# Altium PCB slave.PcbDoc (part 4 of 8)
Units mm, origin at the board's own origin, x right, y up, seen from the top; angles counter-clockwise.
Board outline 160 x 100 mm, 6 copper layers (Top, FUSED_VBAT-, Signals1, Signals2, SUPPLY, Bottom), stack 1.67 mm thick; 597 components, 381 nets, 1695 pads, 3029 vias.
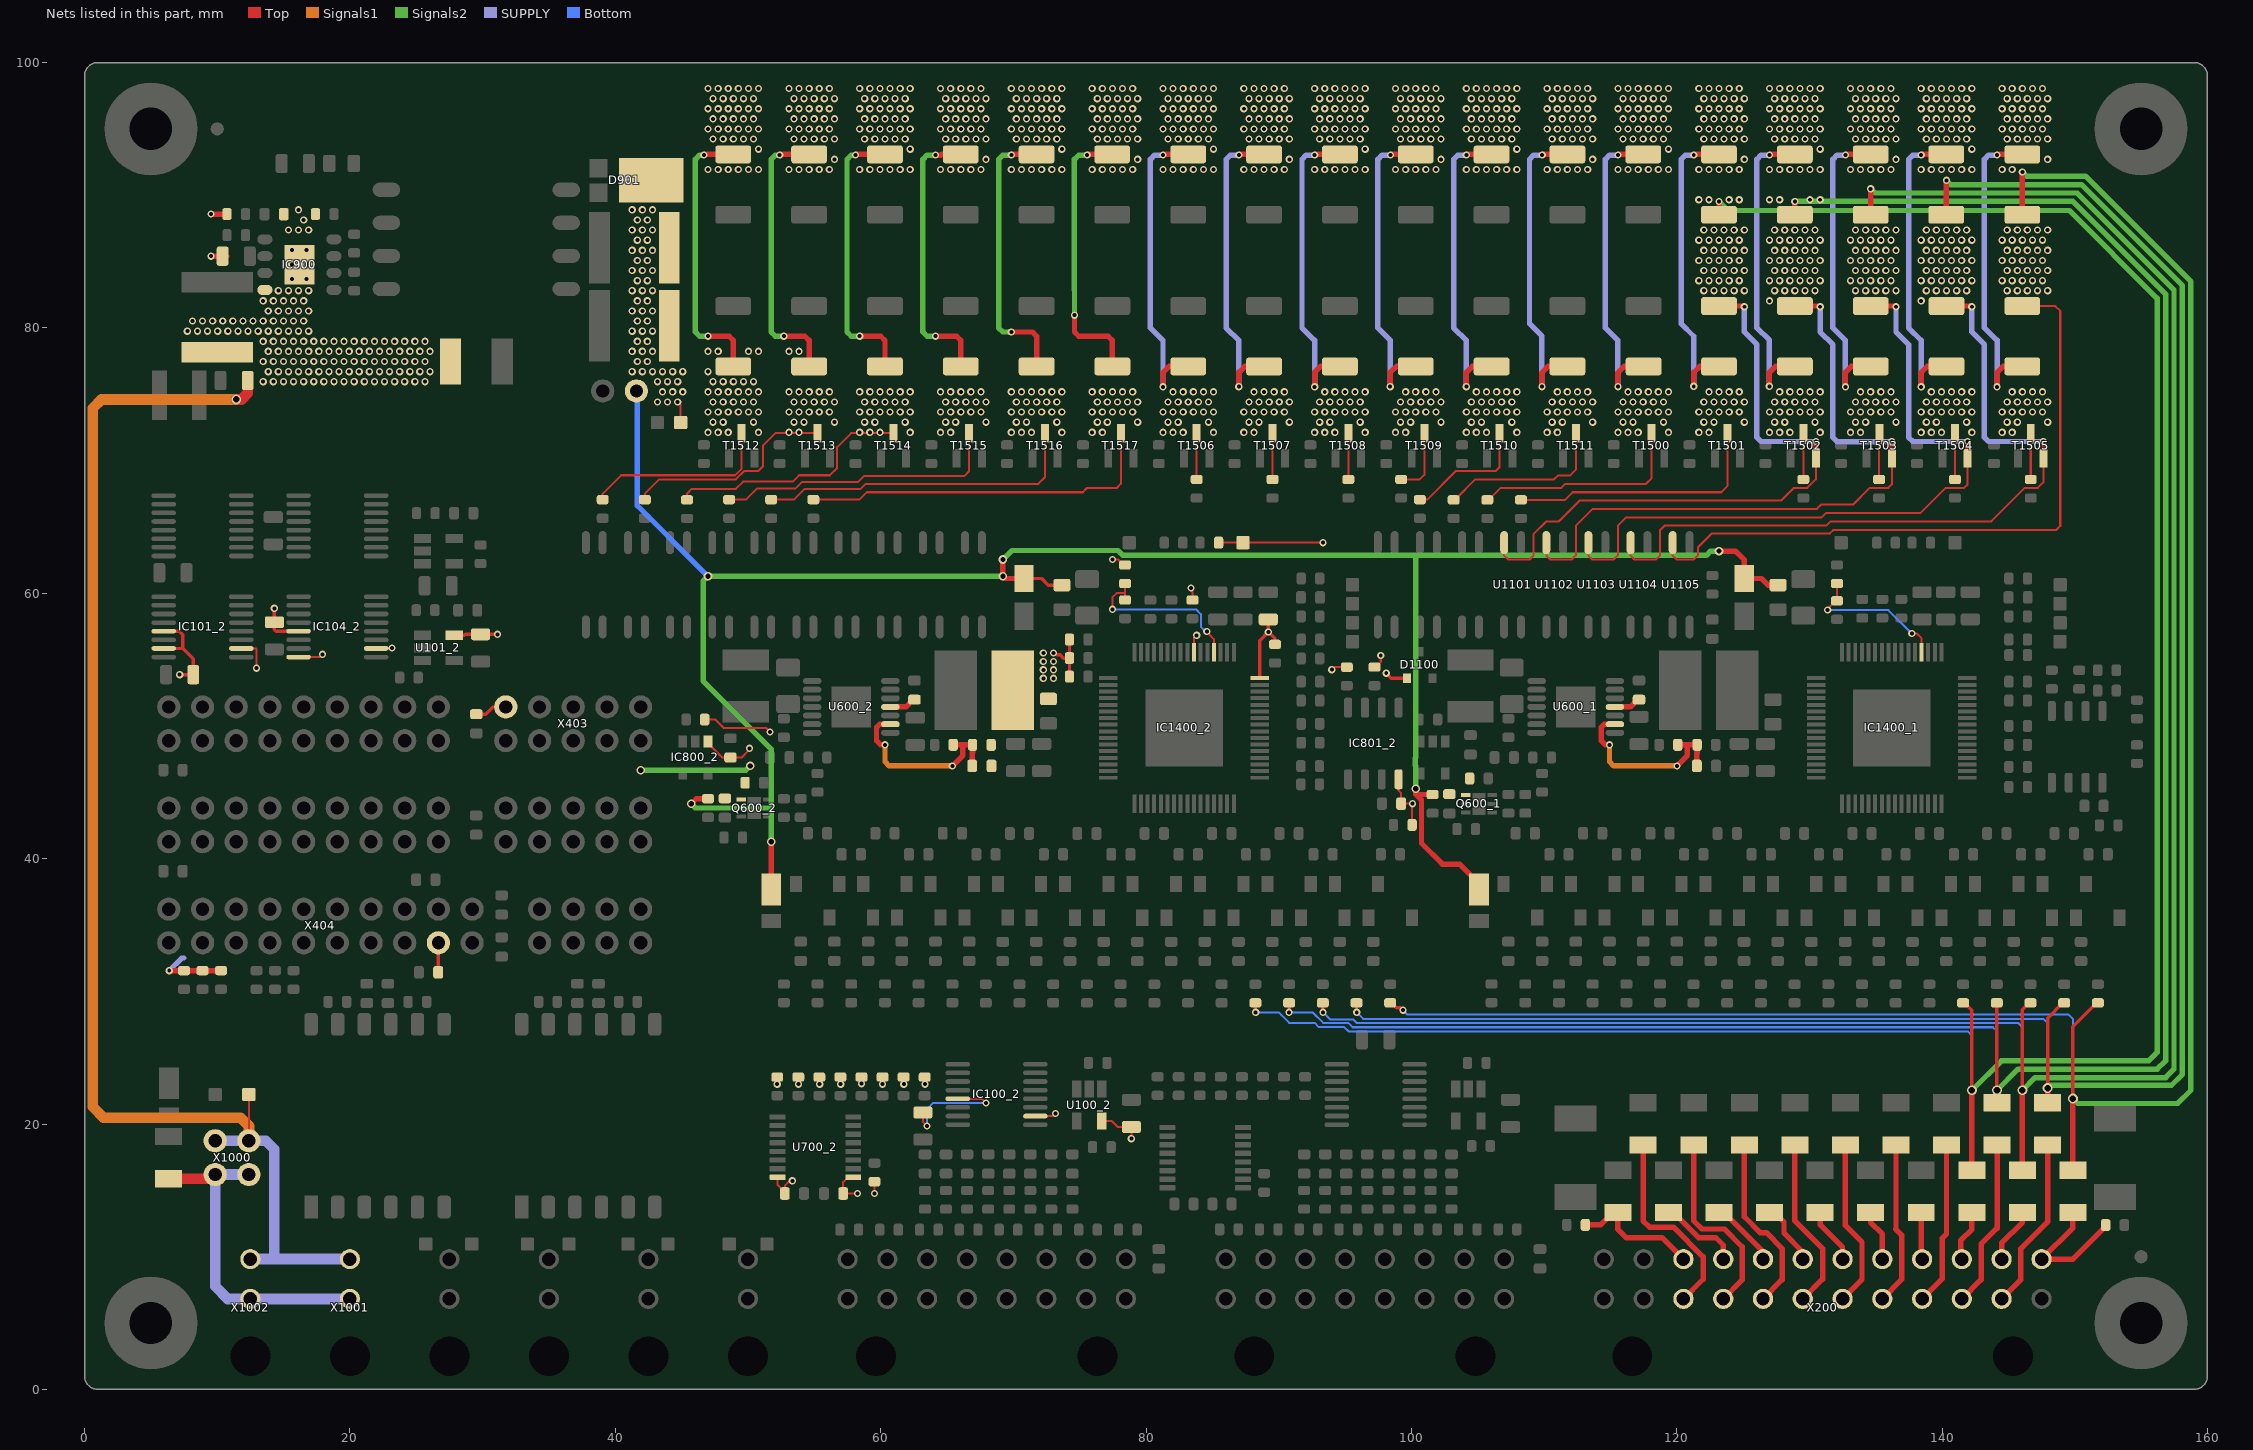
[diagram p7: the nets of this part, all layers, seen from the top]

## Via types
v1: diameter 0.55, hole 0.3, Top to Bottom, tented both sides, 2991 vias
v2: diameter 0.75, hole 0.5, Top to Bottom, tented both sides, 22 vias
v3: diameter 0.65, hole 0.4, Top to Bottom, tented both sides, 16 vias

## Nets (pads, with @x,y where several pads share a name; then routed paths per layer and width w, separated by ;. In a path a pad name is that pad's centre, name@x,y a point inside that pad or via, vN(x,y) a via of type N, cw(c..) or ccw(c..) an arc to the next point about the centre after c; other vN are vias at no path point) (continued)
+5.0V_VREG_1: C101_2.2 C102_2.2 C103_2.2 C104_2.2 C105_2.2 C403.2 C407.2 C604_2.2 C700_2.2 C701_2.2 C800_2.2 C801_2.2 C1401_2.2 D1100.1 IC100_2.2 IC100_2.13 IC101_2.2 IC101_2.13 IC101_2.15 IC104_2.2 IC104_2.13 IC104_2.16 IC800_2.1 IC801_2.8 IC1400_2.48 IC1400_2.55 L600_2.2 LD1400_2.2 R602_2.1 R604_2.1 R700_2.2 R701_2.2 R702_2.2 R703_2.2 R704_2.2 R705_2.2 R706_2.2 R707_2.2 R708_2.1 R800_2.2 R801_2.2 R1404_2.2 R1407_2.2 R1419_2.2 R1420_2.2 R1421_2.2 R1422_2.2 R1423_2.2 R1424_2.2 R1425_2.2 R1426_2.2 R1427_2.2 TP1403_2.1 U100_2.5 U101_2.5 U700_2.1 U700_2.16 X403.9 X404.4 | length 102.8
  Top w0.152: IC101_2.2@11.786,55.842 12.921,55.842 12.954,55.809 v1(12.954,54.356) ; IC104_2.16@16.125,55.193 17.728,55.193 v1(17.939,55.404) ; IC104_2.2@21.946,55.842 23.139,55.842 v1(23.177,55.88) ; R800_2.2@46.737,50.482 47.554,50.482 48.189,49.847 51.363,49.847 v1(51.663,49.548) ; IC800_2.1@46.988,48.825 46.988,48.7 48.063,47.625 C800_2.2@48.677,47.625 49.53,47.625 50.109,48.204 v1(50.109,48.316) ; v1(52.205,23.006) R707_2.2@52.205,23.535 R707_2.2@52.205,23.585 ; U700_2.16@52.236,15.981 52.236,15.401 C700_2.2@52.774,14.864 ; C700_2.2@52.774,14.764 C700_2.2@52.774,14.864 ; v1(53.34,15.716) 53.15,15.716 52.774,15.34 C700_2.2@52.774,14.864 ; R706_2.2@53.792,23.535 53.792,23.026 v1(53.813,23.006) ; R706_2.2@53.792,23.585 53.813,23.565 R706_2.2@53.813,23.535 ; R705_2.2@55.38,23.535 55.38,23.026 v1(55.4,23.006) ; R705_2.2@55.38,23.585 55.4,23.565 R705_2.2@55.4,23.535 ; R704_2.2@56.967,23.535 56.967,23.026 v1(56.988,23.006) ; R704_2.2@56.967,23.585 56.988,23.565 R704_2.2@56.988,23.535 ; U700_2.1@57.936,15.981 57.536,15.981 57.18,15.625 C701_2.2@57.18,14.764 v1(58.261,14.764) ; v1(58.555,23.044) R703_2.2@58.555,23.535 ; R703_2.2@58.555,23.585 R703_2.2@58.58,23.56 ; v1(59.531,14.764) R708_2.1@59.531,15.651 ; v1(60.142,23.006) R702_2.2@60.142,23.535 R702_2.2@60.142,23.585 ; R701_2.2@61.73,23.535 61.73,23.026 v1(61.75,23.006) ; R701_2.2@61.73,23.585 61.75,23.565 R701_2.2@61.75,23.535 ; C101_2.2@63.182,20.869 63.182,20.161 v1(63.5,19.844) ; R700_2.2@63.317,23.535 63.317,23.026 v1(63.338,23.006) ; R700_2.2@63.317,23.585 63.338,23.565 R700_2.2@63.338,23.535 ; IC100_2.13@65.814,21.9 67.635,21.9 v1(67.945,21.59) ; IC100_2.2@71.664,20.6 72.988,20.6 v1(73.184,20.796) 73.184,20.637 v1@73.146,20.6 ; U100_2.5@76.674,20.231 77.4,20.231 77.86,19.771 C103_2.2@78.899,19.771 v1(78.899,18.891) ; v1(77.47,62.547) 77.911,62.547 78.323,62.136 R1407_2.2@78.422,62.136 ; v1(83.384,60.397) 83.502,60.279 R1404_2.2@83.502,59.488 ; IC1400_2.55@83.618,55.598 83.618,56.63 v1(83.82,56.832) ; LD1400_2.2@85.523,63.817 TP1403_2.1@87.312,63.817 v1(93.345,63.817) ; v1(94.005,54.245) 94.194,54.434 R1419_2.2@95.135,54.434 ; R1420_2.2@97.223,54.437 97.323,54.437 97.693,54.808 v1(97.693,55.309) ; IC801_2.8@99.04,45.98 99.04,45.128 99.235,44.933 C801_2.2@99.235,44.147 v1(100.081,44.147) 100.057,44.124 R801_2.2@100.057,42.545
  Top w0.254: IC101_2.15@5.965,55.843 7.403,55.843 ; IC101_2.13@5.965,57.143 7.119,57.143 7.396,56.866 7.396,55.85 7.403,55.843 ; v1(7.166,53.868) C102_2.2@8.191,53.868 8.191,55.055 7.403,55.843 ; v1(14.306,58.864) C105_2.2@14.306,57.818 14.306,57.266 14.429,57.143 IC104_2.13@16.125,57.143 ; C407.2@26.65,31.432 C407.2@26.65,31.5 ; C407.2@26.67,31.52 C407.2@26.65,31.5 ; X404.4@26.67,33.655 26.65,33.635 C407.2@26.65,31.507 ; U101_2.5@27.87,56.83 28.622,56.83 28.697,56.905 C104_2.2@29.845,56.905 v1(31.115,56.905) ; C403.2@29.527,50.89 30.245,50.89 30.777,51.423 X403.9@31.75,51.435 ; 73.279,55.372 73.524,55.372 73.778,55.118 R1422_2.2@74.23,55.118 ; R1421_2.2@74.23,53.721 R1422_2.2@74.23,55.118 ; R1423_2.2@74.23,56.515 R1422_2.2@74.23,55.118 ; IC1400_2.48@88.568,53.597 88.568,56.433 v1(89.218,57.083) ; C1401_2.2@89.218,58.03 v1(89.218,57.083) ; R1424_2.2@89.725,56.152 89.725,56.604 89.697,56.604 v1(89.218,57.083) ; v1(98.108,53.975) 98.485,53.598 D1100.1@99.677,53.598 ; C407.2@26.65,31.5 26.583,31.432 26.613,31.466 C407.2@26.65,31.507 ; C407.2@26.65,31.5 C407.2@26.65,31.507
  Top w0.406: v1@6.35,31.561 v1(6.381,31.561) R1427_2.2@7.493,31.561 R1426_2.2@8.89,31.561 R1425_2.2@10.287,31.561
  Signals2 w0.406: v3(41.91,46.672) 49.847,46.672 v3(50.165,46.99)
  SUPPLY w0.406: v1(6.381,31.561) 7.332,32.512 7.493,32.512
  Bottom w0.152: v1(63.5,19.844) 63.5,21.114 63.976,21.59 v1(67.945,21.59)
  other v1: 72.263,53.594 73.025,53.594 72.263,54.229 73.025,54.229 72.263,54.864 73.025,54.864 72.263,55.499 73.025,55.499
BST_1: C602_1.2 U600_1.11 | length 2
  Top w0.406: U600_1.11@115.345,51.435 116.513,51.435 117.058,51.98 C602_1.2@117.157,51.98
BST_2: C602_2.2 U600_2.11 | length 2
  Top w0.406: U600_2.11@60.735,51.435 61.903,51.435 62.448,51.98 C602_2.2@62.547,51.98
CELL_0+: F318.1 X200.2 | length 13.3
  Top w0.406: X200.2@144.487,6.818 145.94,8.271 145.94,10.611 147.955,12.626 F318.1@147.955,18.413 ; F318.1@147.955,18.413 F318.1@147.955,18.652
CELL_0-: F319.1 SJ301.1 X200.13 | length 10.5
  Top w0.406: F319.1@149.86,13.333 149.86,12.178 X200.13@147.497,9.815 149.868,9.815 152.335,12.283 SJ301.1@152.335,12.383
CELL_1+: F317.1 X200.14 | length 4.2
  Top w0.406: X200.14@144.487,9.815 144.487,11.018 146.05,12.581 F317.1@146.05,13.333
CELL_2+: F316.1 X200.3 | length 12.9
  Top w0.406: X200.3@141.49,6.818 142.945,8.273 142.945,10.954 144.145,12.154 F316.1@144.145,18.413 ; F316.1@144.145,18.413 F316.1@144.145,18.652
CELL_3+: F315.1 X200.15 | length 3.9
  Top w0.406: X200.15@141.49,9.815 141.415,9.89 141.415,11.24 142.24,12.065 F315.1@142.24,13.333
CELL_4+: F314.1 X200.4 | length 12.6
  Top w0.406: X200.4@138.493,6.818 140.017,8.343 140.017,11.407 140.335,11.725 F314.1@140.335,18.413 ; F314.1@140.335,18.413 F314.1@140.335,18.652
CELL_5+: F313.1 X200.16 | length 3.5
  Top w0.406: F313.1@138.43,13.333 138.43,9.878 X200.16@138.493,9.815
CELL_6+: F312.1 X200.5 | length 12.6
  Top w0.406: X200.5@135.496,6.818 136.955,8.277 136.955,11.635 136.505,12.085 136.525,12.105 F312.1@136.525,18.413 ; F312.1@136.525,18.413 F312.1@136.525,18.652
CELL_7+: F311.1 X200.17 | length 3.9
  Top w0.406: F311.1@134.62,13.333 134.62,12.581 135.496,11.705 X200.17@135.496,9.815
CELL_8+: F310.1 X200.6 | length 13
  Top w0.406: X200.6@132.499,6.818 133.965,8.284 133.965,11.105 132.715,12.355 F310.1@132.715,18.413 F310.1@132.715,18.652
CELL_9+: F309.1 X200.18 | length 4.2
  Top w0.406: F309.1@130.81,13.333 130.81,12.415 132.499,10.726 X200.18@132.499,9.815
CELL_10+: F308.1 X200.7 | length 13.3
  Top w0.406: F308.1@128.905,18.652 F308.1@128.905,18.413 128.905,12.7 130.994,10.611 130.994,8.311 X200.7@129.501,6.818
CELL_11+: F307.1 X200.19 | length 4.8
  Top w0.406: F307.1@127,13.333 127.365,13.333 128.087,12.611 128.087,11.772 129.501,10.358 X200.19@129.501,9.815
CELL_12+: F306.1 X200.8 | length 13.9
  Top w0.406: F306.1@125.095,18.652 F306.1@125.095,18.413 125.095,13.01 126.288,11.817 126.754,11.817 127.953,10.619 127.953,8.267 X200.8@126.504,6.818
CELL_13+: F305.1 X200.20 | length 5.1
  Top w0.406: F305.1@123.19,13.333 123.555,13.333 126.504,10.384 X200.20@126.504,9.815
CELL_14+: F304.1 X200.9 | length 14.9
  Top w0.406: F304.1@121.285,18.652 F304.1@121.285,18.413 121.285,12.704 121.904,12.085 123.6,12.085 124.936,10.749 124.936,8.247 X200.9@123.507,6.818
CELL_15+: F303.1 X200.21 | length 6.2
  Top w0.406: F303.1@119.38,13.333 119.745,13.333 121.648,11.43 122.943,11.43 123.507,10.866 X200.21@123.507,9.815
CELL_16+: F302.1 X200.10 | length 15.4
  Top w0.406: F302.1@117.475,18.652 F302.1@117.475,18.413 117.475,12.7 117.951,12.224 119.754,12.224 121.99,9.987 121.99,8.298 X200.10@120.51,6.818
CELL_17+: F301.1 SJ300.2 X200.22 | length 10
  Top w0.406: SJ300.2@113.115,12.395 114.267,12.395 115.205,13.333 F301.1@115.57,13.333 115.57,12.047 116.187,11.43 118.895,11.43 X200.22@120.51,9.815
CELL_FEEDBACK.CELL0_FEEDBACK+: R1105.1 R1505.2 R1511.2 T1505.3 | length 27.2
  Top w0.152: R1105.1@146.685,68.58 T1505.3@146.685,72.07
  Top w0.406: v1(144.145,75.565) 144.145,76.647 144.598,77.1 R1505.2@146.05,77.1 ; v1(144.145,93.027) 144.198,93.08 R1511.2@146.05,93.08
  SUPPLY w0.406: v1(144.145,75.565) 144.145,79.057 143.192,80.01 143.192,92.71 143.51,93.027 v1(144.145,93.027)
  other v1: 144.526,72.136 145.288,72.136 144.907,72.898 145.669,72.898 147.955,72.898 144.526,73.66 145.288,73.66 146.05,73.66 146.812,73.66 147.574,73.66 144.907,74.422 145.669,74.422 146.431,74.422 147.193,74.422 147.955,74.422 145.288,75.184 146.05,75.184 146.812,75.184 147.574,75.184 144.526,91.948 145.288,91.948 147.955,92.71 144.907,94.234 145.669,94.234 146.431,94.234 147.193,94.234 147.955,94.234 144.526,94.996 145.288,94.996 146.05,94.996 146.812,94.996 147.574,94.996 144.907,95.758 145.669,95.758 146.431,95.758 147.193,95.758 147.955,95.758 144.526,96.52 145.288,96.52 146.05,96.52 146.812,96.52 147.574,96.52 144.907,97.282 145.669,97.282 146.431,97.282 147.193,97.282 147.955,97.282 144.526,98.044 145.288,98.044 146.05,98.044 146.812,98.044 147.574,98.044
CELL_FEEDBACK.CELL1_FEEDBACK+: R1104.1 R1504.2 R1510.2 T1504.3 | length 27.2
  Top w0.152: R1104.1@140.97,68.58 T1504.3@140.97,72.07
  Top w0.406: v1(138.43,75.565) 138.43,76.647 138.883,77.1 R1504.2@140.335,77.1 ; v1(138.43,93.027) 138.483,93.08 R1510.2@140.315,93.08
  SUPPLY w0.406: v1(138.43,75.565) 138.43,79.057 137.477,80.01 137.477,92.71 137.795,93.027 v1(138.43,93.027)
  other v1: 138.43,72.136 139.192,72.136 139.954,72.136 142.24,72.136 138.811,72.898 139.573,72.898 141.859,72.898 138.43,73.66 139.192,73.66 139.954,73.66 140.716,73.66 141.478,73.66 142.24,73.66 138.811,74.422 139.573,74.422 140.335,74.422 141.097,74.422 141.859,74.422 139.192,75.184 139.954,75.184 140.716,75.184 141.478,75.184 142.24,75.184 138.43,91.948 139.192,91.948 139.954,91.948 140.716,91.948 141.478,91.948 142.24,91.948 142.24,93.472 138.811,94.234 139.573,94.234 140.335,94.234 141.097,94.234 141.859,94.234 138.43,94.996 139.192,94.996 139.954,94.996 140.716,94.996 141.478,94.996 142.24,94.996 138.811,95.758 139.573,95.758 140.335,95.758 141.097,95.758 141.859,95.758 138.43,96.52 139.192,96.52 139.954,96.52 140.716,96.52 141.478,96.52 142.24,96.52 138.811,97.282 139.573,97.282 140.335,97.282 141.097,97.282 141.859,97.282 138.43,98.044 139.192,98.044 139.954,98.044 140.716,98.044 141.478,98.044 142.24,98.044
CELL_FEEDBACK.CELL2_FEEDBACK+: R1103.1 R1503.2 R1509.2 T1503.3 | length 27.2
  Top w0.152: R1103.1@135.255,68.58 135.255,71.256 135.267,71.268 T1503.3@135.267,72.07
  Top w0.406: v1(132.715,75.565) 132.715,76.647 133.168,77.1 R1503.2@134.62,77.1 ; v1(132.715,93.027) 132.768,93.08 R1509.2@134.62,93.08
  SUPPLY w0.406: v1(132.715,75.565) 132.715,79.057 131.762,80.01 131.762,92.71 132.08,93.027 v1(132.715,93.027)
  other v1: 133.096,72.136 133.858,72.136 133.477,72.898 134.239,72.898 136.525,72.898 133.096,73.66 133.858,73.66 134.62,73.66 135.382,73.66 136.144,73.66 133.477,74.422 134.239,74.422 135.001,74.422 135.763,74.422 136.525,74.422 133.858,75.184 134.62,75.184 135.382,75.184 136.144,75.184 133.096,91.948 133.858,91.948 134.62,91.948 135.382,91.948 136.144,91.948 136.525,92.71 133.477,94.234 134.239,94.234 135.001,94.234 135.763,94.234 136.525,94.234 133.096,94.996 133.858,94.996 134.62,94.996 135.382,94.996 136.144,94.996 133.477,95.758 134.239,95.758 135.001,95.758 135.763,95.758 136.525,95.758 133.096,96.52 133.858,96.52 134.62,96.52 135.382,96.52 136.144,96.52 133.477,97.282 134.239,97.282 135.001,97.282 135.763,97.282 136.525,97.282 133.096,98.044 133.858,98.044 134.62,98.044 135.382,98.044 136.144,98.044
CELL_FEEDBACK.CELL3_FEEDBACK+: R1102.1 R1502.2 R1508.2 T1502.3 | length 27.2
  Top w0.152: R1102.1@129.54,68.58 T1502.3@129.54,72.07
  Top w0.406: v1(126.982,75.595) 126.982,76.628 127.453,77.1 R1502.2@128.905,77.1 ; v1(127,93.027) 127.053,93.08 R1508.2@128.905,93.08
  SUPPLY w0.406: v1@127,75.614 v1(126.982,75.595) 126.982,79.076 126.047,80.01 126.047,92.71 126.365,93.027 v1(127,93.027)
  other v1: 127,72.136 127.762,72.136 128.524,72.136 130.81,72.136 127.381,72.898 128.143,72.898 130.429,72.898 127,73.66 127.762,73.66 128.524,73.66 129.286,73.66 130.048,73.66 130.81,73.66 127.381,74.422 128.143,74.422 128.905,74.422 129.667,74.422 130.429,74.422 127.762,75.184 128.524,75.184 129.286,75.184 130.048,75.184 130.81,75.184 127,91.948 127.762,91.948 128.524,91.948 129.286,91.948 130.048,91.948 130.81,91.948 130.81,93.472 127.381,94.234 128.143,94.234 128.905,94.234 129.667,94.234 130.429,94.234 127,94.996 127.762,94.996 128.524,94.996 129.286,94.996 130.048,94.996 130.81,94.996 127.381,95.758 128.143,95.758 128.905,95.758 129.667,95.758 130.429,95.758 127,96.52 127.762,96.52 128.524,96.52 129.286,96.52 130.048,96.52 130.81,96.52 127.381,97.282 128.143,97.282 128.905,97.282 129.667,97.282 130.429,97.282 127,98.044 127.762,98.044 128.524,98.044 129.286,98.044 130.048,98.044 130.81,98.044
CELL_FEEDBACK.CELL4_FEEDBACK+: R1101.1 R1501.2 R1507.2 T1501.3 | length 43.6
  Top w0.152: R1101.1@108.267,67.045 111.587,67.045 112.157,67.615 123.36,67.615 123.825,68.08 T1501.3@123.825,72.07
  Top w0.406: v1(121.285,75.595) 121.285,76.647 121.738,77.1 R1501.2@123.19,77.1 ; v1(121.285,93.027) 121.338,93.08 R1507.2@123.19,93.08
  SUPPLY w0.406: v1(121.285,75.595) 121.285,79.375 120.332,80.328 120.332,92.71 120.65,93.027 v1(121.285,93.027)
  other v1: 121.666,72.136 122.428,72.136 122.047,72.898 122.809,72.898 125.095,72.898 121.666,73.66 122.428,73.66 123.19,73.66 123.952,73.66 124.714,73.66 122.047,74.422 122.809,74.422 123.571,74.422 124.333,74.422 125.095,74.422 122.428,75.184 123.19,75.184 123.952,75.184 124.714,75.184 121.666,91.948 122.428,91.948 123.19,91.948 123.952,91.948 124.714,91.948 125.095,92.71 122.047,94.234 122.809,94.234 123.571,94.234 124.333,94.234 125.095,94.234 121.666,94.996 122.428,94.996 123.19,94.996 123.952,94.996 124.714,94.996 122.047,95.758 122.809,95.758 123.571,95.758 124.333,95.758 125.095,95.758 121.666,96.52 122.428,96.52 123.19,96.52 123.952,96.52 124.714,96.52 122.047,97.282 122.809,97.282 123.571,97.282 124.333,97.282 125.095,97.282 121.666,98.044 122.428,98.044 123.19,98.044 123.952,98.044 124.714,98.044
CELL_FEEDBACK.CELL5_FEEDBACK+: R1100.1 R1500.2 R1506.2 T1500.3 | length 40.2
  Top w0.152: R1100.1@105.727,67.045 105.827,67.045 106.727,67.945 111.308,67.945 111.613,68.25 117.688,68.25 118.11,68.673 T1500.3@118.11,72.07
  Top w0.406: v1(115.57,75.575) 115.57,76.627 116.043,77.1 R1500.2@117.505,77.1 ; v1(115.57,93.027) 115.623,93.08 R1506.2@117.475,93.08
  SUPPLY w0.406: v1(115.57,75.575) 115.57,79.057 114.617,80.01 114.617,92.71 114.935,93.027 v1(115.57,93.027)
  other v1: 115.57,72.136 116.332,72.136 117.094,72.136 119.38,72.136 115.951,72.898 116.713,72.898 118.999,72.898 115.57,73.66 116.332,73.66 117.094,73.66 117.856,73.66 118.618,73.66 119.38,73.66 115.951,74.422 116.713,74.422 117.475,74.422 118.237,74.422 118.999,74.422 116.332,75.184 117.094,75.184 117.856,75.184 118.618,75.184 119.38,75.184 115.57,91.948 116.332,91.948 117.094,91.948 117.856,91.948 118.618,91.948 119.38,91.948 119.38,93.472 115.951,94.234 116.713,94.234 117.475,94.234 118.237,94.234 118.999,94.234 115.57,94.996 116.332,94.996 117.094,94.996 117.856,94.996 118.618,94.996 119.38,94.996 115.951,95.758 116.713,95.758 117.475,95.758 118.237,95.758 118.999,95.758 115.57,96.52 116.332,96.52 117.094,96.52 117.856,96.52 118.618,96.52 119.38,96.52 115.951,97.282 116.713,97.282 117.475,97.282 118.237,97.282 118.999,97.282 115.57,98.044 116.332,98.044 117.094,98.044 117.856,98.044 118.618,98.044 119.38,98.044
CELL_FEEDBACK.CELL6_FEEDBACK+: R1111.1 R1523.2 R1529.2 T1511.3 | length 36.6
  Top w0.152: R1111.1@103.188,67.045 103.287,67.045 104.824,68.581 110.754,68.581 111.057,68.885 111.965,68.885 112.395,69.315 T1511.3@112.395,72.07
  Top w0.406: v1(109.843,75.575) 109.843,76.634 110.308,77.1 R1523.2@111.76,77.1 ; v1(109.855,93.027) 109.908,93.08 R1529.2@111.76,93.08
  SUPPLY w0.406: v1@109.855,75.588 v1(109.843,75.575) 109.843,79.387 108.902,80.328 108.902,92.71 109.22,93.027 v1(109.855,93.027)
  other v1: 110.236,72.136 110.998,72.136 110.617,72.898 111.379,72.898 113.665,72.898 110.236,73.66 110.998,73.66 111.76,73.66 112.522,73.66 113.284,73.66 110.617,74.422 111.379,74.422 112.141,74.422 112.903,74.422 113.665,74.422 110.998,75.184 111.76,75.184 112.522,75.184 113.284,75.184 110.236,91.948 110.998,91.948 111.76,91.948 112.522,91.948 113.284,91.948 113.665,92.71 110.617,94.234 111.379,94.234 112.141,94.234 112.903,94.234 113.665,94.234 110.236,94.996 110.998,94.996 111.76,94.996 112.522,94.996 113.284,94.996 110.617,95.758 111.379,95.758 112.141,95.758 112.903,95.758 113.665,95.758 110.236,96.52 110.998,96.52 111.76,96.52 112.522,96.52 113.284,96.52 110.617,97.282 111.379,97.282 112.141,97.282 112.903,97.282 113.665,97.282 110.236,98.044 110.998,98.044 111.76,98.044 112.522,98.044 113.284,98.044
CELL_FEEDBACK.CELL7_FEEDBACK+: R1110.1 R1522.2 R1528.2 T1510.3 | length 33.3
  Top w0.152: R1110.1@100.642,67.058 101.194,67.058 103.356,69.22 106.362,69.22 106.66,69.517 T1510.3@106.66,72.07
  Top w0.406: v1(104.14,75.575) 104.14,76.647 104.593,77.1 R1522.2@106.045,77.1 ; v1(104.14,93.027) 104.193,93.08 R1528.2@106.045,93.08
  SUPPLY w0.406: v1(104.14,75.575) 104.14,79.057 103.188,80.01 103.188,92.71 103.505,93.027 v1(104.14,93.027)
  other v1: 104.14,72.136 104.902,72.136 105.664,72.136 107.95,72.136 104.521,72.898 105.283,72.898 107.569,72.898 104.14,73.66 104.902,73.66 105.664,73.66 106.426,73.66 107.188,73.66 107.95,73.66 104.521,74.422 105.283,74.422 106.045,74.422 106.807,74.422 107.569,74.422 104.902,75.184 105.664,75.184 106.426,75.184 107.188,75.184 107.95,75.184 104.14,91.948 104.902,91.948 105.664,91.948 106.426,91.948 107.188,91.948 107.95,91.948 107.95,93.472 104.521,94.234 105.283,94.234 106.045,94.234 106.807,94.234 107.569,94.234 104.14,94.996 104.902,94.996 105.664,94.996 106.426,94.996 107.188,94.996 107.95,94.996 104.521,95.758 105.283,95.758 106.045,95.758 106.807,95.758 107.569,95.758 104.14,96.52 104.902,96.52 105.664,96.52 106.426,96.52 107.188,96.52 107.95,96.52 104.521,97.282 105.283,97.282 106.045,97.282 106.807,97.282 107.569,97.282 104.14,98.044 104.902,98.044 105.664,98.044 106.426,98.044 107.188,98.044 107.95,98.044
CELL_FEEDBACK.CELL8_FEEDBACK+: R1109.1 R1521.2 R1527.2 T1509.3 | length 28.7
  Top w0.152: R1109.1@99.235,68.58 100.631,68.58 100.98,68.929 T1509.3@100.98,72.07
  Top w0.406: v1(98.405,75.575) 98.405,76.627 98.878,77.1 R1521.2@100.33,77.1 ; v1(98.425,93.027) 98.478,93.08 R1527.2@100.33,93.08
  SUPPLY w0.406: v1(98.405,75.575) 98.405,79.078 97.472,80.01 97.472,92.71 97.79,93.027 v1(98.425,93.027)
  other v1: 98.806,72.136 99.568,72.136 99.187,72.898 99.949,72.898 102.235,72.898 98.806,73.66 99.568,73.66 100.33,73.66 101.092,73.66 101.854,73.66 99.187,74.422 99.949,74.422 100.711,74.422 101.473,74.422 102.235,74.422 99.568,75.184 100.33,75.184 101.092,75.184 101.854,75.184 98.806,91.948 99.568,91.948 100.33,91.948 101.092,91.948 101.854,91.948 102.235,92.71 99.187,94.234 99.949,94.234 100.711,94.234 101.473,94.234 102.235,94.234 98.806,94.996 99.568,94.996 100.33,94.996 101.092,94.996 101.854,94.996 99.187,95.758 99.949,95.758 100.711,95.758 101.473,95.758 102.235,95.758 98.806,96.52 99.568,96.52 100.33,96.52 101.092,96.52 101.854,96.52 99.187,97.282 99.949,97.282 100.711,97.282 101.473,97.282 102.235,97.282 98.806,98.044 99.568,98.044 100.33,98.044 101.092,98.044 101.854,98.044
CELL_FEEDBACK.CELL9_FEEDBACK+: R1108.1 R1520.2 R1526.2 T1508.3 | length 27.2
  Top w0.152: R1108.1@95.25,68.58 T1508.3@95.25,72.07
  Top w0.406: v1(92.71,75.565) 92.71,76.647 93.163,77.1 R1520.2@94.615,77.1 ; v1(92.71,93.027) 92.763,93.08 R1526.2@94.615,93.08
  SUPPLY w0.406: v1(92.71,75.565) 92.71,79.057 91.757,80.01 91.757,92.71 92.075,93.027 v1(92.71,93.027)
  other v1: 92.71,72.136 93.472,72.136 94.234,72.136 96.52,72.136 93.091,72.898 93.853,72.898 96.139,72.898 92.71,73.66 93.472,73.66 94.234,73.66 94.996,73.66 95.758,73.66 96.52,73.66 93.091,74.422 93.853,74.422 94.615,74.422 95.377,74.422 96.139,74.422 93.472,75.184 94.234,75.184 94.996,75.184 95.758,75.184 96.52,75.184 92.71,91.948 93.472,91.948 94.234,91.948 94.996,91.948 95.758,91.948 96.52,91.948 96.52,93.472 93.091,94.234 93.853,94.234 94.615,94.234 95.377,94.234 96.139,94.234 92.71,94.996 93.472,94.996 94.234,94.996 94.996,94.996 95.758,94.996 96.52,94.996 93.091,95.758 93.853,95.758 94.615,95.758 95.377,95.758 96.139,95.758 92.71,96.52 93.472,96.52 94.234,96.52 94.996,96.52 95.758,96.52 96.52,96.52 93.091,97.282 93.853,97.282 94.615,97.282 95.377,97.282 96.139,97.282 92.71,98.044 93.472,98.044 94.234,98.044 94.996,98.044 95.758,98.044 96.52,98.044
CELL_FEEDBACK.CELL10_FEEDBACK+: R1107.1 R1519.2 R1525.2 T1507.3 | length 27.2
  Top w0.152: R1107.1@89.535,68.58 T1507.3@89.535,72.07
  Top w0.406: v1(86.995,75.575) 86.995,76.647 87.448,77.1 R1519.2@88.9,77.1 ; v1(86.995,93.027) 87.048,93.08 R1525.2@88.9,93.08
  SUPPLY w0.406: v1@86.995,75.565 v1(86.995,75.575) 86.995,79.057 86.042,80.01 86.042,92.71 86.36,93.027 v1(86.995,93.027)
  other v1: 87.376,72.136 88.138,72.136 87.757,72.898 88.519,72.898 90.805,72.898 87.376,73.66 88.138,73.66 88.9,73.66 89.662,73.66 90.424,73.66 87.757,74.422 88.519,74.422 89.281,74.422 90.043,74.422 90.805,74.422 88.138,75.184 88.9,75.184 89.662,75.184 90.424,75.184 87.376,91.948 88.138,91.948 88.9,91.948 89.662,91.948 90.424,91.948 90.805,92.71 87.757,94.234 88.519,94.234 89.281,94.234 90.043,94.234 90.805,94.234 87.376,94.996 88.138,94.996 88.9,94.996 89.662,94.996 90.424,94.996 87.757,95.758 88.519,95.758 89.281,95.758 90.043,95.758 90.805,95.758 87.376,96.52 88.138,96.52 88.9,96.52 89.662,96.52 90.424,96.52 87.757,97.282 88.519,97.282 89.281,97.282 90.043,97.282 90.805,97.282 87.376,98.044 88.138,98.044 88.9,98.044 89.662,98.044 90.424,98.044
CELL_FEEDBACK.CELL11_FEEDBACK+: R1106.1 R1518.2 R1524.2 T1506.3 | length 27.2
  Top w0.152: R1106.1@83.82,68.58 T1506.3@83.82,72.07
  Top w0.406: v1(81.28,75.565) 81.28,76.647 81.733,77.1 R1518.2@83.185,77.1 ; v1(81.28,93.027) 81.333,93.08 R1524.2@83.185,93.08
  SUPPLY w0.406: v1(81.28,75.565) 81.28,79.057 80.328,80.01 80.328,92.71 80.645,93.027 v1(81.28,93.027)
  other v1: 81.28,72.136 82.042,72.136 82.804,72.136 85.09,72.136 81.661,72.898 82.423,72.898 84.709,72.898 81.28,73.66 82.042,73.66 82.804,73.66 83.566,73.66 84.328,73.66 85.09,73.66 81.661,74.422 82.423,74.422 83.185,74.422 83.947,74.422 84.709,74.422 82.042,75.184 82.804,75.184 83.566,75.184 84.328,75.184 85.09,75.184 81.28,91.948 82.042,91.948 82.804,91.948 83.566,91.948 84.328,91.948 85.09,91.948 85.09,93.472 81.661,94.234 82.423,94.234 83.185,94.234 83.947,94.234 84.709,94.234 81.28,94.996 82.042,94.996 82.804,94.996 83.566,94.996 84.328,94.996 85.09,94.996 81.661,95.758 82.423,95.758 83.185,95.758 83.947,95.758 84.709,95.758 81.28,96.52 82.042,96.52 82.804,96.52 83.566,96.52 84.328,96.52 85.09,96.52 81.661,97.282 82.423,97.282 83.185,97.282 83.947,97.282 84.709,97.282 81.28,98.044 82.042,98.044 82.804,98.044 83.566,98.044 84.328,98.044 85.09,98.044
CELL_FEEDBACK.CELL12_FEEDBACK+: R1117.1 R1541.2 R1547.2 T1517.3 | length 48.6
  Top w0.152: R1117.1@54.915,67.058 58.402,67.058 58.959,67.615 75.235,67.615 75.555,67.935 77.795,67.935 78.105,68.245 T1517.3@78.105,72.07
  Top w0.406: v1(74.612,80.962) 74.612,79.692 74.93,79.375 77.153,79.375 77.465,79.062 R1541.2@77.465,77.1 ; v1(75.565,93.027) 75.618,93.08 R1547.2@77.45,93.08
  Signals2 w0.406: 74.602,82.867 74.602,92.7 74.93,93.027 v1(75.565,93.027) ; v1(74.612,80.962) 74.612,82.867
  other v1: 75.946,72.136 76.708,72.136 76.327,72.898 77.089,72.898 79.375,72.898 75.946,73.66 76.708,73.66 77.47,73.66 78.232,73.66 78.994,73.66 76.327,74.422 77.089,74.422 77.851,74.422 78.613,74.422 79.375,74.422 75.946,75.184 76.708,75.184 77.47,75.184 78.232,75.184 78.994,75.184 75.946,91.948 76.708,91.948 77.47,91.948 78.232,91.948 78.994,91.948 79.375,92.71 76.327,94.234 77.089,94.234 77.851,94.234 78.613,94.234 79.375,94.234 75.946,94.996 76.708,94.996 77.47,94.996 78.232,94.996 78.994,94.996 76.327,95.758 77.089,95.758 77.851,95.758 78.613,95.758 79.375,95.758 75.946,96.52 76.708,96.52 77.47,96.52 78.232,96.52 78.994,96.52 76.327,97.282 77.089,97.282 77.851,97.282 78.613,97.282 79.375,97.282 75.946,98.044 76.708,98.044 77.47,98.044 78.232,98.044 78.994,98.044
CELL_FEEDBACK.CELL13_FEEDBACK+: R1116.1 R1540.2 R1546.2 T1516.3 | length 45.8
  Top w0.152: R1116.1@51.752,67.058 53.455,67.058 54.266,67.869 58.495,67.869 58.87,68.245 71.893,68.245 72.39,68.741 T1516.3@72.39,72.07
  Top w0.406: v1(69.85,79.692) 71.438,79.692 71.755,79.375 R1540.2@71.755,77.1 ; v1(69.85,93.027) 69.903,93.08 R1546.2@71.755,93.08
  Signals2 w0.406: v1(69.85,79.692) 69.215,79.692 68.897,80.01 68.897,92.71 69.215,93.027 v1(69.85,93.027)
  other v1: 69.85,72.136 70.612,72.136 71.374,72.136 73.66,72.136 70.231,72.898 70.993,72.898 73.279,72.898 69.85,73.66 70.612,73.66 71.374,73.66 72.136,73.66 72.898,73.66 73.66,73.66 70.231,74.422 70.993,74.422 71.755,74.422 72.517,74.422 73.279,74.422 69.85,75.184 70.612,75.184 71.374,75.184 72.136,75.184 72.898,75.184 73.66,75.184 69.85,91.948 70.612,91.948 71.374,91.948 72.136,91.948 72.898,91.948 73.66,91.948 73.66,93.472 70.231,94.234 70.993,94.234 71.755,94.234 72.517,94.234 73.279,94.234 69.85,94.996 70.612,94.996 71.374,94.996 72.136,94.996 72.898,94.996 73.66,94.996 70.231,95.758 70.993,95.758 71.755,95.758 72.517,95.758 73.279,95.758 69.85,96.52 70.612,96.52 71.374,96.52 72.136,96.52 72.898,96.52 73.66,96.52 70.231,97.282 70.993,97.282 71.755,97.282 72.517,97.282 73.279,97.282 69.85,98.044 70.612,98.044 71.374,98.044 72.136,98.044 72.898,98.044 73.66,98.044
CELL_FEEDBACK.CELL14_FEEDBACK+: R1115.1 R1539.2 R1545.2 T1515.3 | length 43
  Top w0.152: R1115.1@48.578,67.058 49.847,67.058 50.701,67.911 53.59,67.911 54.056,68.377 58.284,68.377 58.741,68.834 66.294,68.834 66.675,69.215 T1515.3@66.675,72.07
  Top w0.406: v1(64.135,79.375) 65.722,79.375 66.04,79.057 R1539.2@66.04,77.1 ; v1(64.135,93.027) 64.536,93.027 64.588,93.08 R1545.2@66.04,93.08
  Signals2 w0.406: v1(64.135,79.375) 63.5,79.375 63.182,79.692 63.182,92.71 63.5,93.027 v1(64.135,93.027)
  other v1: 64.516,72.136 65.278,72.136 64.897,72.898 65.659,72.898 67.945,72.898 64.516,73.66 65.278,73.66 66.04,73.66 66.802,73.66 67.564,73.66 64.897,74.422 65.659,74.422 66.421,74.422 67.183,74.422 67.945,74.422 64.516,75.184 65.278,75.184 66.04,75.184 66.802,75.184 67.564,75.184 64.516,91.948 65.278,91.948 66.04,91.948 66.802,91.948 67.564,91.948 67.945,92.71 64.897,94.234 65.659,94.234 66.421,94.234 67.183,94.234 67.945,94.234 64.516,94.996 65.278,94.996 66.04,94.996 66.802,94.996 67.564,94.996 64.897,95.758 65.659,95.758 66.421,95.758 67.183,95.758 67.945,95.758 64.516,96.52 65.278,96.52 66.04,96.52 66.802,96.52 67.564,96.52 64.897,97.282 65.659,97.282 66.421,97.282 67.183,97.282 67.945,97.282 64.516,98.044 65.278,98.044 66.04,98.044 66.802,98.044 67.564,98.044
CELL_FEEDBACK.CELL15_FEEDBACK+: R1114.1 R1538.2 R1544.2 T1514.3 | length 39.9
  Top w0.152: R1114.1@45.402,67.045 45.402,67.497 45.775,67.869 49.086,67.869 49.636,68.419 53.38,68.419 53.858,68.897 56.174,68.897 56.723,69.446 56.723,71.023 57.77,72.07 T1514.3@60.96,72.07
  Top w0.406: v1(58.102,93.027) 58.155,93.08 R1544.2@60.325,93.08 ; v1(58.42,79.375) 60.008,79.375 60.325,79.057 R1538.2@60.325,77.1
  Signals2 w0.406: v1(58.102,93.027) 57.785,93.027 57.468,92.71 57.468,79.692 57.785,79.375 v1(58.42,79.375)
  other v1: 58.42,72.136 59.182,72.136 59.944,72.136 62.23,72.136 58.801,72.898 59.563,72.898 61.849,72.898 58.42,73.66 59.182,73.66 59.944,73.66 60.706,73.66 61.468,73.66 62.23,73.66 58.801,74.422 59.563,74.422 60.325,74.422 61.087,74.422 61.849,74.422 58.42,75.184 59.182,75.184 59.944,75.184 60.706,75.184 61.468,75.184 62.23,75.184 58.42,91.948 59.182,91.948 59.944,91.948 60.706,91.948 61.468,91.948 62.23,91.948 62.23,93.472 58.801,94.234 59.563,94.234 60.325,94.234 61.087,94.234 61.849,94.234 58.42,94.996 59.182,94.996 59.944,94.996 60.706,94.996 61.468,94.996 62.23,94.996 58.801,95.758 59.563,95.758 60.325,95.758 61.087,95.758 61.849,95.758 58.42,96.52 59.182,96.52 59.944,96.52 60.706,96.52 61.468,96.52 62.23,96.52 58.801,97.282 59.563,97.282 60.325,97.282 61.087,97.282 61.849,97.282 58.42,98.044 59.182,98.044 59.944,98.044 60.706,98.044 61.468,98.044 62.23,98.044
CELL_FEEDBACK.CELL16_FEEDBACK+: R1113.1 R1537.2 R1543.2 T1513.3 | length 37.3
  Top w0.152: R1113.1@42.227,67.058 42.227,67.509 43.298,68.58 49.079,68.58 49.714,69.215 50.776,69.215 51.117,69.556 51.117,71.12 52.067,72.07 T1513.3@55.245,72.07
  Top w0.406: v1(52.387,93.027) 52.44,93.08 R1543.2@54.61,93.08 ; v1(52.705,79.375) 54.292,79.375 54.61,79.057 54.61,77.877 R1537.2@54.61,77.1
  Signals2 w0.406: 51.752,81.269 51.752,79.692 52.07,79.375 v1(52.705,79.375) ; 51.752,81.315 51.752,92.71 52.07,93.027 v1(52.387,93.027)
  other v1: 53.086,72.136 53.848,72.136 53.467,72.898 54.229,72.898 56.515,72.898 53.086,73.66 53.848,73.66 54.61,73.66 55.372,73.66 56.134,73.66 53.467,74.422 54.229,74.422 54.991,74.422 55.753,74.422 56.515,74.422 53.086,75.184 53.848,75.184 54.61,75.184 55.372,75.184 56.134,75.184 53.086,78.232 53.848,78.232 53.086,91.948 53.848,91.948 54.61,91.948 55.372,91.948 56.134,91.948 56.515,92.71 53.467,94.234 54.229,94.234 54.991,94.234 55.753,94.234 56.515,94.234 53.086,94.996 53.848,94.996 54.61,94.996 55.372,94.996 56.134,94.996 53.467,95.758 54.229,95.758 54.991,95.758 55.753,95.758 56.515,95.758 53.086,96.52 53.848,96.52 54.61,96.52 55.372,96.52 56.134,96.52 53.467,97.282 54.229,97.282 54.991,97.282 55.753,97.282 56.515,97.282 53.086,98.044 53.848,98.044 54.61,98.044 55.372,98.044 56.134,98.044
CELL_FEEDBACK.CELL17_FEEDBACK+: R1112.1 R1536.2 R1542.2 T1512.3 | length 35.5
  Top w0.152: R1112.1@39.052,67.058 39.052,67.509 40.441,68.897 49.036,68.897 49.53,69.391 T1512.3@49.53,72.07
  Top w0.406: v1(46.672,93.027) 46.725,93.08 R1542.2@48.895,93.08 ; v1(46.99,79.375) 48.578,79.375 48.895,79.057 R1536.2@48.895,77.1
  Signals2 w0.406: v1(46.672,93.027) 46.355,93.027 46.038,92.71 46.038,79.692 46.355,79.375 v1(46.99,79.375)
  other v1: 46.99,72.136 47.752,72.136 48.514,72.136 50.8,72.136 47.371,72.898 48.133,72.898 50.419,72.898 46.99,73.66 47.752,73.66 48.514,73.66 49.276,73.66 50.038,73.66 50.8,73.66 47.371,74.422 48.133,74.422 48.895,74.422 49.657,74.422 50.419,74.422 46.99,75.184 47.752,75.184 48.514,75.184 49.276,75.184 50.038,75.184 50.8,75.184 47.371,75.946 48.133,75.946 48.895,75.946 49.657,75.946 50.419,75.946 46.99,76.708 46.99,78.232 47.752,78.232 50.038,78.232 50.8,78.232 46.99,91.948 47.752,91.948 48.514,91.948 49.276,91.948 50.038,91.948 50.8,91.948 50.8,93.472 47.371,94.234 48.133,94.234 48.895,94.234 49.657,94.234 50.419,94.234 46.99,94.996 47.752,94.996 48.514,94.996 49.276,94.996 50.038,94.996 50.8,94.996 47.371,95.758 48.133,95.758 48.895,95.758 49.657,95.758 50.419,95.758 46.99,96.52 47.752,96.52 48.514,96.52 49.276,96.52 50.038,96.52 50.8,96.52 47.371,97.282 48.133,97.282 48.895,97.282 49.657,97.282 50.419,97.282 46.99,98.044 47.752,98.044 48.514,98.044 49.276,98.044 50.038,98.044 50.8,98.044
DTEN_1: IC1400_1.52 R1406_1.2 R1407_1.1 | length 11.1
  Top w0.152: v1(131.38,58.737) 131.38,58.837 131.98,59.437 R1406_1.2@132.08,59.437 ; R1406_1.2@132.08,59.488 R1407_1.1@132.08,60.527 ; v1(137.719,56.972) 138.1,56.972 138.457,56.615 IC1400_1.52@138.457,55.598
  Bottom w0.152: v1(131.38,58.737) 135.953,58.737 v1(137.719,56.972)
DTEN_2: IC1400_2.52 R1406_2.2 R1407_2.1 | length 13.5
  Top w0.152: v1(77.47,58.788) 77.47,59.69 77.787,60.008 78.422,60.008 ; R1407_2.1@78.307,60.527 R1407_2.1@78.422,60.527 ; R1406_2.2@78.422,59.488 78.422,60.008 ; R1407_2.1@78.422,60.736 R1407_2.1@78.422,60.527 ; v1(84.583,57.119) 84.799,56.902 84.799,56.854 85.117,56.536 IC1400_2.52@85.117,55.598 ; 78.422,60.008 R1407_2.1@78.422,60.527
  Bottom w0.152: v1(77.47,58.788) 83.77,58.788 84.138,58.42 84.138,57.468 84.486,57.119 v1(84.583,57.119)
EXT_DC_IN+: F900.1 X1000.1 X1000.3 X1001.1 X1002.1 | length 25.2
  Top w0.813: F900.1@6.33,15.873 9.523,15.873 X1000.1@9.842,16.192
  SUPPLY w0.813: X1000.3@12.383,16.192 X1000.1@9.842,16.192 9.842,7.771 10.795,6.818 X1002.1@12.5,6.818 X1001.1@20,6.818
EXT_DC_IN-: C900.1 C902.1 C903.1 C904.1 C906.1 IC900.4 IC900.9 R901.1 R905.1 TP900.1 X1000.2 X1000.4 X1001.2 X1002.2 | length 105.8
  Top w0.152: X1000.4@12.383,18.732 TP900.1@12.383,22.225
  Top w0.406: v1(9.525,85.407) C904.1@10.405,85.407 C904.1@10.705,85.407 ; v1(9.525,88.582) R901.1@10.73,88.582
  Top w0.813: v2(11.43,74.612) 11.82,74.612 12.296,75.089 C900.1@12.296,76.041
  Signals1 w0.813: v2(11.43,74.612) 1.27,74.612 0.61,73.952 0.61,21.298 1.429,20.479 11.747,20.479 12.383,19.844 X1000.4@12.383,18.732
  SUPPLY w0.813: X1000.2@9.842,18.732 X1000.4@12.383,18.732 13.652,18.732 14.287,18.098 14.287,9.815 ; X1002.2@12.383,9.932 X1002.2@12.5,9.815 14.287,9.815 ; X1001.2@20,9.815 14.287,9.815
  other v1: 13.462,75.946 14.224,75.946 14.986,75.946 15.748,75.946 16.51,75.946 17.272,75.946 18.034,75.946 18.796,75.946 19.558,75.946 20.32,75.946 21.082,75.946 21.844,75.946 22.606,75.946 23.368,75.946 24.13,75.946 24.892,75.946 25.654,75.946 13.843,76.708 14.605,76.708 15.367,76.708 16.129,76.708 16.891,76.708 17.653,76.708 18.415,76.708 19.177,76.708 19.939,76.708 20.701,76.708 21.463,76.708 22.225,76.708 22.987,76.708 23.749,76.708 24.511,76.708 25.273,76.708 26.035,76.708 13.462,77.47 14.224,77.47 14.986,77.47 15.748,77.47 16.51,77.47 17.272,77.47 18.034,77.47 18.796,77.47 19.558,77.47 20.32,77.47 21.082,77.47 21.844,77.47 22.606,77.47 23.368,77.47 24.13,77.47 24.892,77.47 25.654,77.47 13.843,78.232 14.605,78.232 15.367,78.232 16.129,78.232 16.891,78.232 17.653,78.232 18.415,78.232 19.177,78.232 19.939,78.232 20.701,78.232 21.463,78.232 22.225,78.232 22.987,78.232 23.749,78.232 24.511,78.232 25.273,78.232 26.035,78.232 13.462,78.994 14.224,78.994 14.986,78.994 15.748,78.994 16.51,78.994 17.272,78.994 18.034,78.994 18.796,78.994 19.558,78.994 20.32,78.994 21.082,78.994 21.844,78.994 22.606,78.994 23.368,78.994 24.13,78.994 24.892,78.994 25.654,78.994 7.747,79.756 8.509,79.756 9.271,79.756 10.033,79.756 10.795,79.756 11.557,79.756 12.319,79.756 13.081,79.756 13.843,79.756 14.605,79.756 15.367,79.756 16.129,79.756 16.891,79.756 8.128,80.518 8.89,80.518 9.652,80.518 10.414,80.518 11.176,80.518 11.938,80.518 12.7,80.518 13.462,80.518 14.224,80.518 14.986,80.518 15.748,80.518 16.51,80.518 13.843,81.28 14.605,81.28 15.367,81.28 16.129,81.28 16.891,81.28 13.462,82.042 14.224,82.042 14.986,82.042 15.748,82.042 16.51,82.042 14.605,82.804 15.367,82.804 16.129,82.804 16.891,82.804 15.642,83.672 16.742,83.672 15.642,84.772 16.742,84.772 15.642,85.873 16.742,85.873 15.367,87.376 16.129,87.376 16.891,87.376 16.51,88.138 16.129,88.9
EXT_DC_ISO+: C608_1.1 C608_2.1 C907.2 C908.2 D901.1 D1400_1.2 D1400_2.2 D1401_1.1 D1401_2.1 Q600_1.4 Q600_2.4 R607_1.2 R607_2.2 R609_1.2 R609_2.2 R1401_1.1 R1401_2.1 TP902.1 X900.1 | length 169.6
  Top w0.152: v1(44.704,74.422) 44.926,74.2 TP902.1@44.926,72.866 ; v1(44.704,75.946) v1@44.767,75.882
  Top w0.254: D1401_2.1@70.802,61.115 72.125,61.115 72.625,60.615 R1401_2.1@73.66,60.615
  Top w0.406: v3(45.72,44.133) 46.102,44.515 R607_2.2@46.988,44.515 ; D1400_2.2@51.752,37.68 v3(51.752,41.275) ; v3(69.215,62.547) v3(69.215,61.277) 69.377,61.115 D1401_2.1@70.802,61.115 ; v3(100.33,45.257) 100.33,44.862 100.36,44.832 ; R607_1.2@101.6,44.832 100.36,44.832 ; D1400_1.2@105.093,37.68 105.093,38.13 103.638,39.585 102.337,39.585 100.762,41.16 100.762,44.43 100.36,44.832 ; v3(123.19,63.182) 124.429,63.182 125.095,62.517 D1401_1.1@125.095,61.215 ; D1401_1.1@125.095,61.115 126.383,61.115 126.883,60.615 R1401_1.1@127.635,60.615
  Signals2 w0.406: v3(45.72,44.133) 46.038,43.815 51.752,43.815 ; v3(51.752,41.275) 51.752,43.815 ; v3(69.215,61.277) v3(46.99,61.277) 46.626,60.914 46.626,53.386 51.752,48.26 51.752,43.815 ; v3(69.215,62.547) 69.896,63.229 77.89,63.229 78.254,62.865 100.33,62.865 ; v3(100.33,45.257) 100.33,46.979 100.284,47.025 100.284,47.59 100.33,47.636 100.33,62.865 ; v3(123.19,63.182) 122.555,63.182 122.237,62.865 100.33,62.865
  Bottom w0.406: X900.1@41.593,75.248 41.656,75.184 41.656,66.611 v3(46.99,61.277)
  other v1: 43.18,74.422 43.942,74.422 43.561,75.184 44.323,75.184 45.085,75.184 43.18,75.946 43.942,75.946 41.275,76.708 42.037,76.708 42.799,76.708 43.561,76.708 44.323,76.708 45.085,76.708 41.656,77.47 42.418,77.47 41.275,78.232 42.037,78.232 42.799,78.232 41.656,78.994 42.418,78.994 41.275,79.756 42.037,79.756 42.799,79.756 41.656,80.518 42.418,80.518 41.275,81.28 42.037,81.28 42.799,81.28 41.656,82.042 42.418,82.042 41.275,82.804 42.037,82.804 42.799,82.804 41.656,83.566 42.418,83.566 41.275,84.328 42.037,84.328 42.799,84.328 41.656,85.09 42.418,85.09 41.275,85.852 42.037,85.852 42.799,85.852 41.656,86.614 42.418,86.614 41.275,87.376 42.037,87.376 42.799,87.376 41.656,88.138 42.418,88.138 41.275,88.9 42.037,88.9 42.799,88.9
FB_1: C604_1.1 R602_1.2 R603_1.1 U600_1.9 | length 14.4
  Top w0.406: v1(114.935,48.578) 114.617,48.578 114.3,48.895 114.3,49.892 114.543,50.135 U600_1.9@115.345,50.135 ; v1(120.015,46.99) 120.809,47.784 120.809,48.578 ; R603_1.1@120.08,48.578 120.809,48.578 ; C604_1.1@121.513,46.99 121.513,48.001 121.538,48.026 R602_1.2@121.538,48.578 120.809,48.578
  Signals1 w0.406: v1(114.935,48.578) 114.935,47.307 115.252,46.99 v1(120.015,46.99)
FB_2: C604_2.1 R602_2.2 R603_2.1 U600_2.9 | length 14.4
  Top w0.406: v1(60.325,48.578) 60.008,48.578 59.69,48.895 59.69,49.892 59.933,50.135 U600_2.9@60.735,50.135 ; v1(65.405,46.99) 66.199,47.784 66.199,48.578 ; R603_2.1@65.47,48.578 66.199,48.578 ; C604_2.1@66.903,46.99 66.903,48.001 66.928,48.026 R602_2.2@66.928,48.578 66.199,48.578
  Signals1 w0.406: v1(60.325,48.578) 60.325,47.307 60.642,46.99 v1(65.405,46.99)
FUSED_CELL.CELL_0+: F318.2 R1305_1.1 R1305_2.1 R1504.1 R1510.1 T1505.2 U1104.2 | length 215.4
  Top w0.152: U1104.2@116.522,63.817 116.522,62.841 116.816,62.547 118.427,62.547 118.745,62.865 118.745,64.77 119.079,65.104 131.281,65.104 131.595,65.418 143.72,65.418 146.248,67.945 147.226,67.945 147.635,68.354 T1505.2@147.635,70.17
  Top w0.254: R1305_2.1@95.865,29.133 95.865,28.436 v1(95.885,28.416) ; v2(147.955,22.701) 147.955,27.983 149.105,29.133 R1305_1.1@149.205,29.133
  Top w0.406: R1510.1@140.315,88.53 140.315,91.102 v1(140.335,91.123) ; R1504.1@140.335,81.65 142.187,81.65 v1(142.24,81.597) ; T1505.2@147.635,70.17 147.635,71.435 v1(147.637,71.438) ; F318.2@147.955,21.593 v2(147.955,22.701)
  Signals2 w0.406: v1(140.335,91.123) 140.653,90.805 150.495,90.805 158.115,83.185 158.115,81.597 158.115,70.619 158.115,24.13 158.115,23.747 157.275,22.906 148.16,22.906 v2(147.955,22.701)
  SUPPLY w0.406: v1(142.24,81.597) 142.24,79.692 143.192,78.74 143.192,71.755 143.51,71.438 v1(147.637,71.438)
  Bottom w0.152: v1(95.885,28.416) 96.374,27.928 147.637,27.928 147.955,27.61 v2(147.955,22.701)
  other v1: 138.43,82.042 138.811,82.804 139.573,82.804 140.335,82.804 141.097,82.804 141.859,82.804 138.43,83.566 139.192,83.566 139.954,83.566 140.716,83.566 141.478,83.566 142.24,83.566 138.811,84.328 139.573,84.328 140.335,84.328 141.097,84.328 141.859,84.328 138.43,85.09 139.192,85.09 139.954,85.09 140.716,85.09 141.478,85.09 142.24,85.09 138.811,85.852 139.573,85.852 140.335,85.852 141.097,85.852 141.859,85.852 138.43,86.614 139.192,86.614 139.954,86.614 140.716,86.614 141.478,86.614 142.24,86.614 138.811,87.376 139.573,87.376 140.335,87.376 141.097,87.376 141.859,87.376
FUSED_CELL.CELL_0-: F319.2 R1306_1.1 R1306_2.1 R1505.1 R1511.1 U1105.2 | length 212.3
  Top w0.152: U1105.2@119.697,63.817 119.697,62.841 119.991,62.547 121.285,62.547 121.602,62.865 121.602,63.458 122.66,64.516 131.55,64.516 131.797,64.763 148.59,64.763 148.907,65.08 148.907,81.28 148.537,81.65 R1505.1@146.05,81.65
  Top w0.254: R1306_2.1@98.405,29.133 98.505,29.133 98.876,28.762 99.191,28.762 v1(99.377,28.575) ; v2(149.86,21.907) 149.86,27.348 151.645,29.133 R1306_1.1@151.745,29.133
  Top w0.406: R1511.1@146.05,88.582 v1(146.05,91.757) ; F319.2@149.86,16.258 F319.2@149.86,16.513 v2(149.86,21.907)
  Signals2 w0.406: v1(146.05,91.757) 146.368,91.44 150.812,91.44 158.75,83.503 158.75,70.619 158.75,22.543 157.751,21.544 150.224,21.544 v2(149.86,21.907)
  Bottom w0.152: v1(99.377,28.575) 99.707,28.245 149.542,28.245 149.86,27.928 v2(149.86,21.907)
  other v1: 144.907,82.804 145.669,82.804 146.431,82.804 147.193,82.804 147.955,82.804 144.526,83.566 145.288,83.566 146.05,83.566 146.812,83.566 147.574,83.566 144.907,84.328 145.669,84.328 146.431,84.328 147.193,84.328 147.955,84.328 144.526,85.09 145.288,85.09 146.05,85.09 146.812,85.09 147.574,85.09 144.907,85.852 145.669,85.852 146.431,85.852 147.193,85.852 147.955,85.852 144.526,86.614 145.288,86.614 146.05,86.614 146.812,86.614 147.574,86.614 144.907,87.376 145.669,87.376 146.431,87.376 147.193,87.376 147.955,87.376
FUSED_CELL.CELL_1+: F317.2 R1304_1.1 R1304_2.1 R1503.1 R1509.1 T1504.2 U1103.2 | length 223.7
  Top w0.152: U1103.2@113.347,63.817 113.347,62.841 113.641,62.547 115.252,62.547 115.57,62.865 115.57,65.095 116.197,65.722 130.925,65.722 131.243,66.04 138.365,66.04 140.27,67.945 141.67,67.945 141.92,68.195 T1504.2@141.92,70.17
  Top w0.254: R1304_2.1@93.325,29.133 93.325,28.436 v1(93.345,28.416) ; v2(146.05,22.543) 146.05,28.618 146.565,29.133 R1304_1.1@146.665,29.133
  Top w0.406: R1503.1@134.62,81.65 136.472,81.65 v1(136.525,81.597) ; R1509.1@134.62,88.53 v1(134.62,90.487) ; T1504.2@141.92,70.17 141.92,71.435 v1(141.922,71.438) ; F317.2@146.05,16.513 v2(146.05,22.543)
  Signals2 w0.406: v1(134.62,90.487) 134.937,90.17 150.177,90.17 157.48,82.867 157.48,81.597 157.48,70.619 157.48,24.13 156.845,23.495 147.002,23.495 v2(146.05,22.543)
  SUPPLY w0.406: v1(136.525,81.597) 136.525,79.692 137.477,78.74 137.477,71.755 137.795,71.438 v1(141.922,71.438)
  Bottom w0.152: v1(93.345,28.416) 93.885,27.877 95.631,27.877 95.897,27.61 145.732,27.61 146.05,27.293 v2(146.05,22.543)
  other v1: 133.477,82.804 134.239,82.804 135.001,82.804 135.763,82.804 136.525,82.804 133.096,83.566 133.858,83.566 134.62,83.566 135.382,83.566 136.144,83.566 133.477,84.328 134.239,84.328 135.001,84.328 135.763,84.328 136.525,84.328 133.096,85.09 133.858,85.09 134.62,85.09 135.382,85.09 136.144,85.09 133.477,85.852 134.239,85.852 135.001,85.852 135.763,85.852 136.525,85.852 133.096,86.614 133.858,86.614 134.62,86.614 135.382,86.614 136.144,86.614 133.477,87.376 134.239,87.376 135.001,87.376 135.763,87.376 136.525,87.376
FUSED_CELL.CELL_2+: F316.2 R1303_1.1 R1303_2.1 R1502.1 R1508.1 T1503.2 U1102.2 | length 220.9
  Top w0.152: U1102.2@110.172,63.817 110.172,62.841 110.466,62.547 112.078,62.547 112.395,62.865 112.395,65.087 113.665,66.358 130.56,66.358 130.878,66.675 133.285,66.675 134.555,67.945 135.955,67.945 136.217,68.207 T1503.2@136.217,70.17
  Top w0.254: v1(90.785,28.416) R1303_2.1@90.785,29.133 ; R1303_1.1@144.125,29.133 144.125,22.563 v2(144.145,22.543)
  Top w0.406: R1502.1@128.905,81.65 130.757,81.65 v1(130.81,81.597) ; R1508.1@128.905,88.53 v1(128.905,89.535) ; T1503.2@136.217,70.17 v1(136.217,71.428) ; F316.2@144.145,21.338 F316.2@144.145,21.593 v2(144.145,22.543)
  Signals2 w0.406: v1(128.905,89.535) 149.86,89.535 156.845,82.55 156.845,81.597 156.845,70.619 156.845,24.765 156.21,24.13 145.732,24.13 v2(144.145,22.543)
  SUPPLY w0.406: v1(130.81,81.597) 130.81,79.692 131.762,78.74 131.762,71.755 132.09,71.428 v1(136.217,71.428)
  Bottom w0.152: v1@90.805,28.416 92.551,28.416 93.345,27.622 95.25,27.622 95.58,27.293 143.827,27.293 144.145,26.975 v2(144.145,22.543)
  other v1: 127,82.042 127.381,82.804 128.143,82.804 128.905,82.804 129.667,82.804 130.429,82.804 127,83.566 127.762,83.566 128.524,83.566 129.286,83.566 130.048,83.566 130.81,83.566 127.381,84.328 128.143,84.328 128.905,84.328 129.667,84.328 130.429,84.328 127,85.09 127.762,85.09 128.524,85.09 129.286,85.09 130.048,85.09 130.81,85.09 127.381,85.852 128.143,85.852 128.905,85.852 129.667,85.852 130.429,85.852 127,86.614 127.762,86.614 128.524,86.614 129.286,86.614 130.048,86.614 130.81,86.614 127.381,87.376 128.143,87.376 128.905,87.376 129.667,87.376 130.429,87.376 127,89.662 127.762,89.662 130.048,89.662 130.81,89.662
FUSED_CELL.CELL_3+: F315.2 R1302_1.1 R1302_2.1 R1501.1 R1507.1 T1502.2 U1101.2 | length 229.2
  Top w0.152: U1101.2@106.998,63.817 106.998,62.841 107.291,62.547 108.902,62.547 109.22,62.865 109.22,64.477 110.148,65.405 111.093,65.405 112.68,66.992 127.887,66.992 128.84,67.945 129.854,67.945 130.49,68.581 T1502.2@130.49,70.17
  Top w0.254: R1302_2.1@88.245,29.133 88.245,28.436 v1(88.265,28.416) ; R1302_1.1@141.585,29.133 141.685,29.133 142.24,28.577 v2(142.24,22.543)
  Top w0.406: R1501.1@123.19,81.65 125.042,81.65 v1(125.095,81.597) ; R1507.1@123.19,88.53 v1(123.19,89.535) ; T1502.2@130.49,70.17 130.49,71.435 v1(130.493,71.438) ; F315.2@142.24,16.513 v2(142.24,22.543)
  Signals2 w0.406: v1(123.19,89.535) 123.871,88.854 149.589,88.854 156.21,82.233 156.21,81.597 156.21,70.619 156.21,25.4 155.575,24.765 144.463,24.765 v2(142.24,22.543)
  SUPPLY w0.406: v1(125.095,81.597) 125.095,79.692 126.047,78.74 126.047,71.755 126.365,71.438 v1(130.493,71.438)
  Bottom w0.152: v1(88.265,28.416) 90.011,28.416 90.231,28.197 90.231,28.187 90.795,27.622 92.71,27.622 93.027,27.305 94.932,27.305 95.262,26.975 141.922,26.975 142.24,26.658 v2(142.24,22.543)
  other v1: 122.047,82.804 122.809,82.804 123.571,82.804 124.333,82.804 125.095,82.804 121.666,83.566 122.428,83.566 123.19,83.566 123.952,83.566 124.714,83.566 122.047,84.328 122.809,84.328 123.571,84.328 124.333,84.328 125.095,84.328 121.666,85.09 122.428,85.09 123.19,85.09 123.952,85.09 124.714,85.09 122.047,85.852 122.809,85.852 123.571,85.852 124.333,85.852 125.095,85.852 121.666,86.614 122.428,86.614 123.19,86.614 123.952,86.614 124.714,86.614 122.047,87.376 122.809,87.376 123.571,87.376 124.333,87.376 125.095,87.376 121.666,89.662 122.428,89.662 123.952,89.662 124.714,89.662